# Altium PCB LUCID_LIGHT_PCB_Outer.PcbDoc (part 1 of 2)
Units mm, origin at the board's own origin, x right, y up, seen from the top; angles counter-clockwise.
Board outline 85 x 174.55 mm, 4 copper layers (Top Layer, GND, +48V_Fused, Bottom Layer), stack 1.58 mm thick; 120 components, 77 nets, 408 pads, 278 vias.
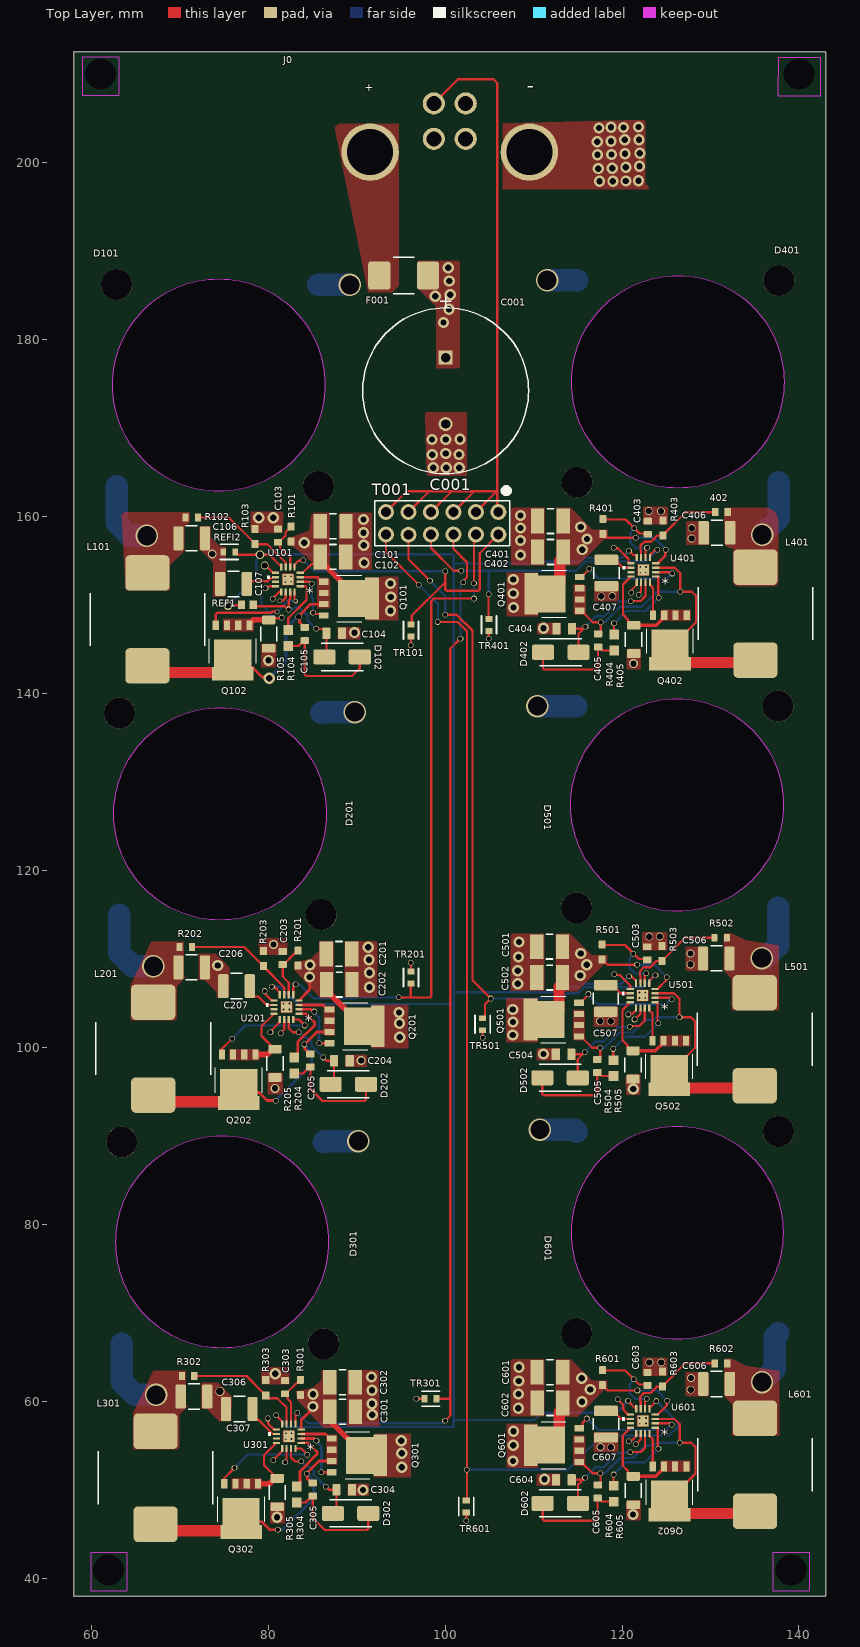
[diagram p0: Top Layer view]
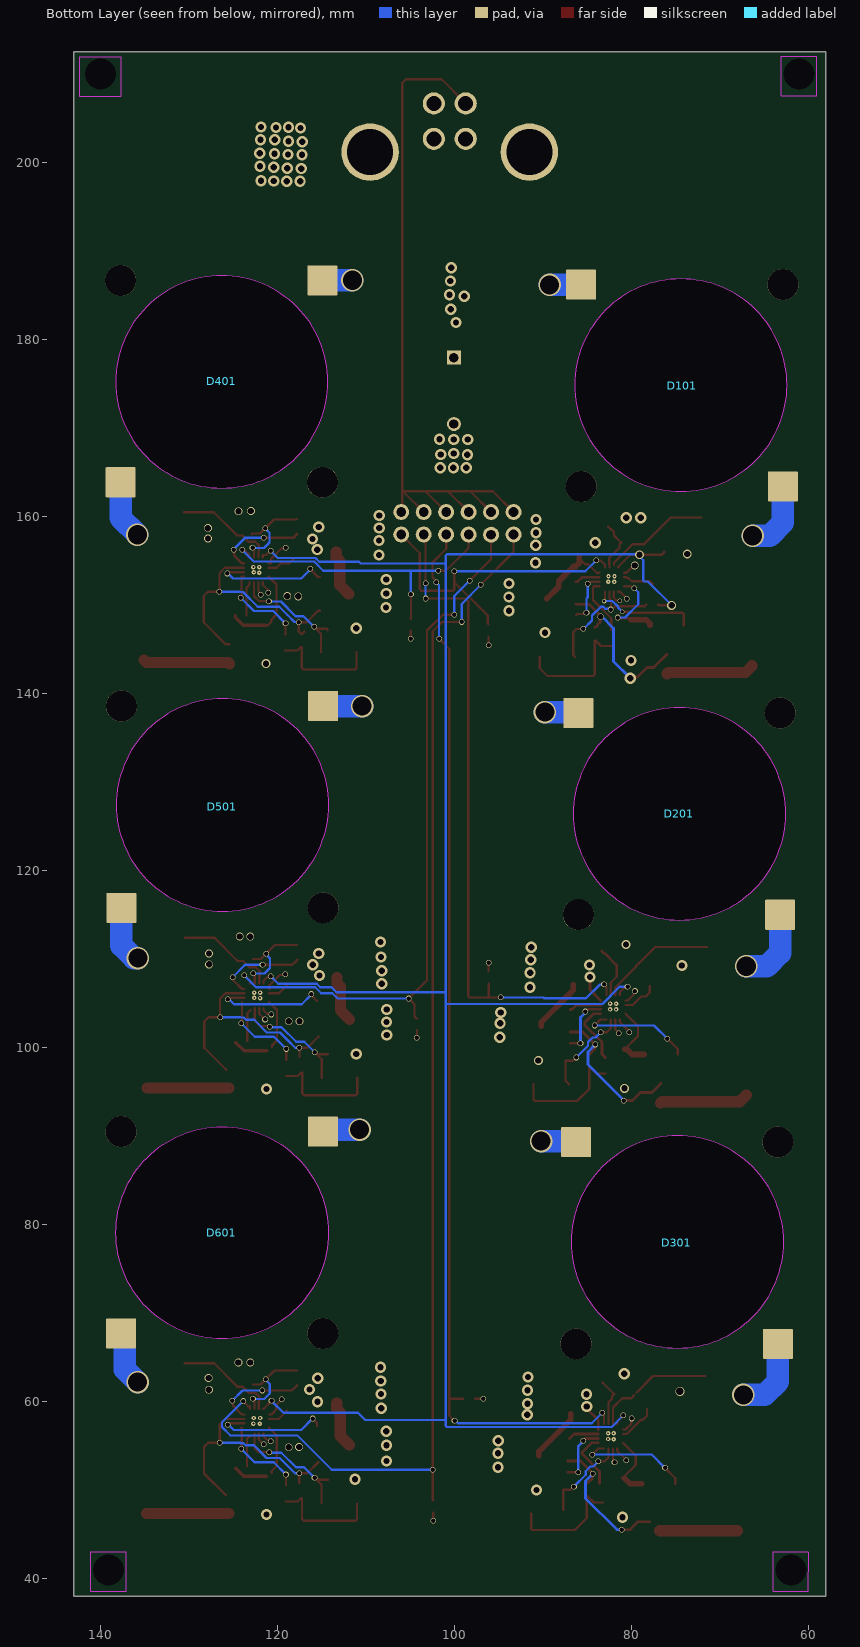
[diagram p1: Bottom Layer view, seen from below]
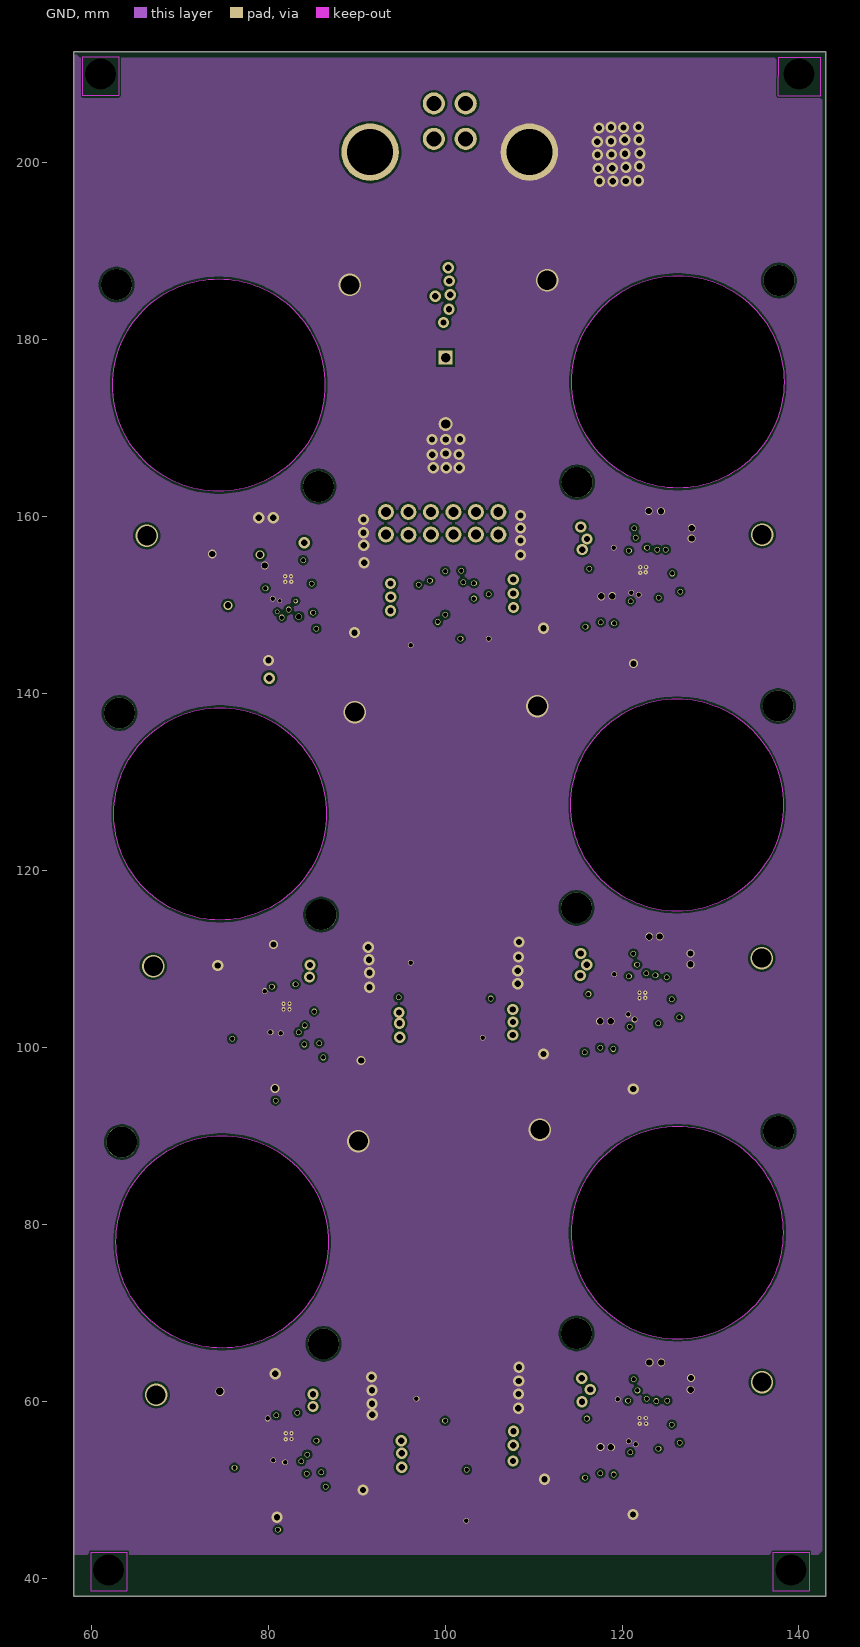
[diagram p2: GND]
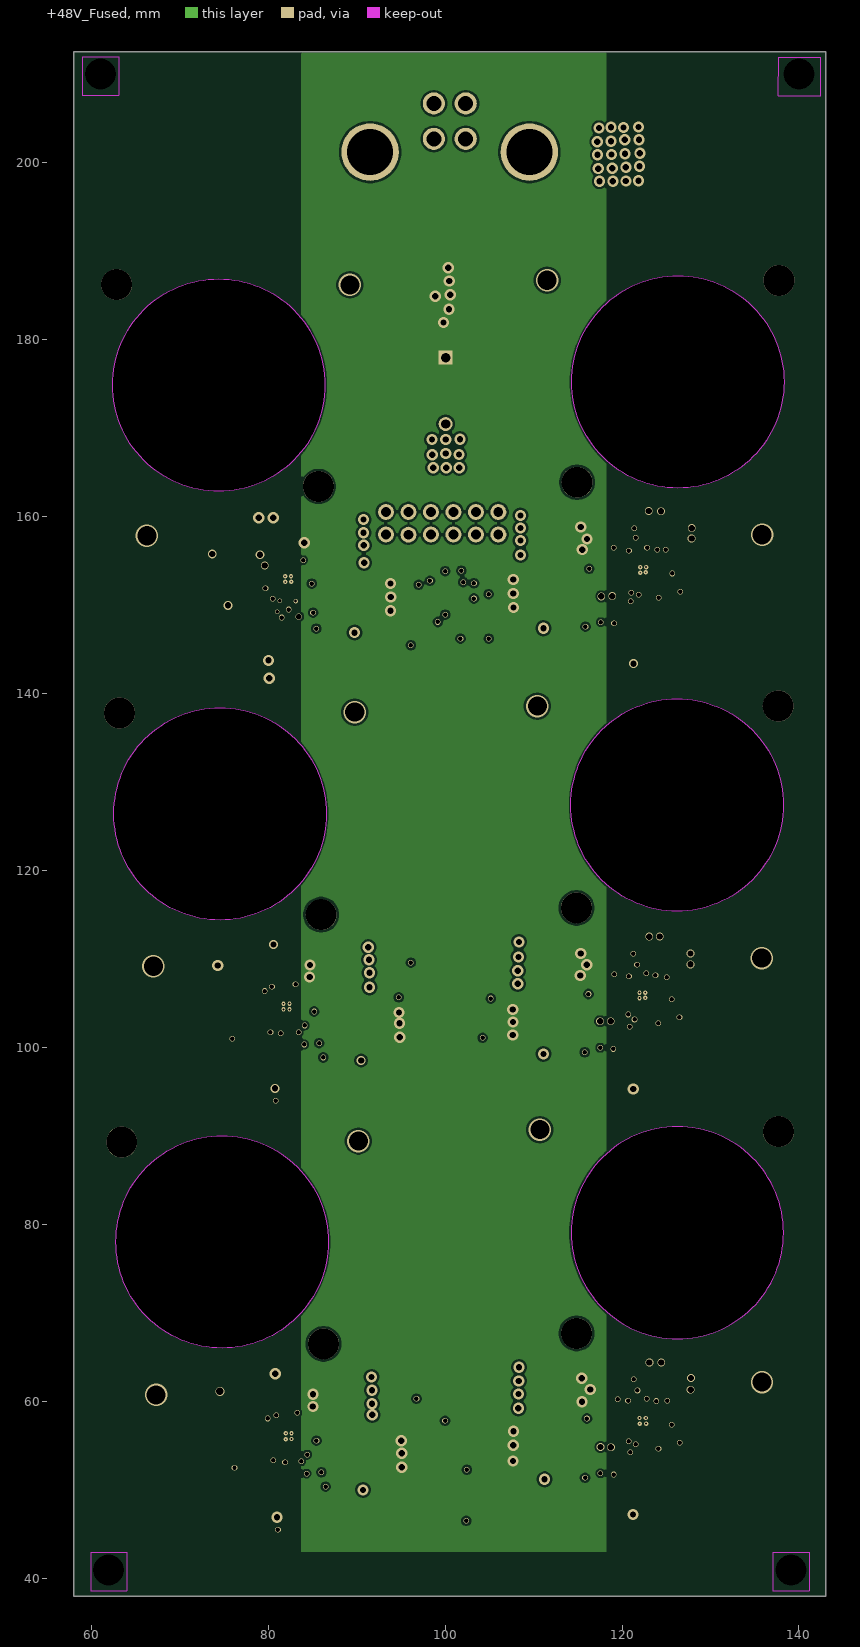
[diagram p3: +48V_Fused]

## Layer stack, top to bottom
Top Solder: solder mask 0.01, Solder Resist, Dk 3.5
Top Layer: signal copper 0.07
Dielectric 2: prepreg 0.2, PP-006, Dk 4.1
GND: signal copper 0.07
Dielectric 1: dielectric 0.9, FR-4, Dk 4.8
+48V_Fused: signal copper 0.07
Dielectric 3: prepreg 0.2, PP-006, Dk 4.1
Bottom Layer: signal copper 0.07
Bottom Solder: solder mask 0.01, Solder Resist, Dk 3.5

## Board outline
58.039,38 58.039,212.545 143.039,212.545 143.039,38
cut-out: 74.81,66.05 cw(c74.81,78.05) 62.81,78.05 cw(c74.81,78.05) 74.81,90.05 cw(c74.81,78.05) 86.81,78.05 cw(c74.81,78.05)
cut-out: 74.58,114.42 cw(c74.58,126.42) 62.58,126.42 cw(c74.58,126.42) 74.58,138.42 cw(c74.58,126.42) 86.58,126.42 cw(c74.58,126.42)
cut-out: 114.26,79.09 ccw(c126.26,79.09) 126.26,67.09 ccw(c126.26,79.09) 138.26,79.09 ccw(c126.26,79.09) 126.26,91.09 ccw(c126.26,79.09)
cut-out: 126.22,115.42 cw(c126.22,127.42) 114.22,127.42 cw(c126.22,127.42) 126.22,139.42 cw(c126.22,127.42) 138.22,127.42 cw(c126.22,127.42)
cut-out: 126.31,163.23 cw(c126.31,175.23) 114.31,175.23 cw(c126.31,175.23) 126.31,187.23 cw(c126.31,175.23) 138.31,175.23 cw(c126.31,175.23)
cut-out: 74.43,162.87 cw(c74.43,174.87) 62.43,174.87 cw(c74.43,174.87) 74.43,186.87 cw(c74.43,174.87) 86.43,174.87 cw(c74.43,174.87)

## Design rules (kind name [scope] priority, off if disabled: settings)
Clearance [All] p1: gap=0.254 ignorepadtopadclearanceinfootprint=FALSE except(0.152: Arc-Arc Arc-Track Arc-SMDPad Track-Track Track-SMDPad SMDPad-SMDPad; 0.203: Arc-Via Track-Via SMDPad-Via THPad-Via Via-Via)
HoleSize [All] p1: absolutevalues=TRUE maxlimit=5.334 minlimit=0.025 maxpercent=80.000 minpercent=20.000
MinimumSolderMaskSliver [All] p1: minsoldermaskwidth=0.15
PolygonConnect [All] p1: connectstyle=Direct reliefconductorwidth=0.254 reliefentries=4 polygonreliefangle="90 Angle" airgapwidth=0.254
PolygonConnect LX [InNet('LX-1')] p2: connectstyle=Direct reliefconductorwidth=0.254 reliefentries=4 polygonreliefangle="90 Angle" airgapwidth=0.254
PolygonConnect +48V [InNet('+48V')] p3: connectstyle=Direct reliefconductorwidth=0.254 reliefentries=4 polygonreliefangle="90 Angle" airgapwidth=0.254
PolygonConnect GND [InNet('GND')] p4: connectstyle=Direct reliefconductorwidth=0.254 reliefentries=4 polygonreliefangle="90 Angle" airgapwidth=0.254
RoutingVias [All] p1: holewidth=0.508 width=0.635 viastyle="Through Hole" minholewidth=0.508 minwidth=0.635 maxholewidth=5.334 maxwidth=5.334
SolderMaskExpansion MAX20078_Mask [IsPad AND InComponent('U101','U201','U301','U401','U501','U601')] p1: expansion=0.051 istentingtop=FALSE
SolderMaskExpansion Tent_All_Vias [IsVia] p2: expansion=0 istentingtop=TRUE
SolderMaskExpansion [All] p3: expansion=0 istentingtop=FALSE
SupplyNets "Schematic Supply Nets_1" [InNet('+48V')] p1: voltage=0.000
SupplyNets "Schematic Supply Nets" [InNet('GND')] p2: voltage=0.000
Width [All] p1: maxlimit=5.334 minlimit=0.254 preferedwidth=0.254 minimp=50.000000 maximp=50.000000 favimp=50.000000
28 further rules are at their usual default settings.

## Classes and differential pairs
component class Power_Connector: C001 F001 J0 T001
component class LED_BUK_6: C601 C602 C603 C604 C605 C606 C607 D601 D602 L601 Q601 Q602 R601 R602 R603 R604 R605 TR601 U601
component class LED_BUK_5: C501 C502 C503 C504 C505 C506 C507 D501 D502 L501 Q501 Q502 R501 R502 R503 R504 R505 TR501 U501
component class LED_BUK_4: 402 C401 C402 C403 C404 C405 C406 C407 D401 D402 L401 Q401 Q402 R401 R403 R404 R405 TR401 U401
component class LED_BUK_3: C301 C302 C303 C304 C305 C306 C307 D301 D302 L301 Q301 Q302 R301 R302 R303 R304 R305 TR301 U301
component class LED_BUK_2: C201 C202 C203 C204 C205 C206 C207 D201 D202 L201 Q201 Q202 R201 R202 R203 R204 R205 TR201 U201
component class LED_BUK_1: C101 C102 C103 C104 C105 C106 C107 D101 D102 L101 Q101 Q102 R101 R102 R103 R104 R105 REF1 REFI2 TR101 U101

## Components (designator, comment, footprint, x,y, rotation, side; value= is the part's Value field where it differs from the comment)
402 "RC0603FR-07324KL" RESC1608X55X25NL10T15 131.24,160.51 r180 top
C001 "MAL214658471E3" CAP_2135_18X20_VIS 100.07,177.97 r270 top
C101 "12101C225KAT2A" FP-1210-L_3_3_0_4-W_2_5_0-IPC_B 87.36,158.92 r0 top
C102 "12101C225KAT2A" FP-1210-L_3_3_0_4-W_2_5_0-IPC_B 87.34,155.45 r0 top
C103 "GRM1885C1H471JA01D" C_0603_1608Metric 81.129,157.849 r270 top
C104 "*AC0805KFX7R7BB225" C_0805_2012Metric 87.48,146.84 r180 top
C105 "CL10B224KA8NNNC" C_0603_1608Metric 84.15,146.75 r90 top
C106 "CL31B105KCHVPNE" C_1210_3225Metric 71.371,157.553 r0 top
C107 "CL31B105KCHVPNE" C_1210_3225Metric 76.1,152.4 r180 top
C201 "12101C225KAT2A" FP-1210-L_3_3_0_4-W_2_5_0-IPC_B 88.02,110.59 r0 top
C202 "12101C225KAT2A" FP-1210-L_3_3_0_4-W_2_5_0-IPC_B 88.05,107.12 r0 top
C203 "GRM1885C1H471JA01D" C_0603_1608Metric 81.66,110.12 r270 top
C204 "*AC0805KFX7R7BB225" C_0805_2012Metric 88.35,98.52 r0 top
C205 "CL10B224KA8NNNC" C_0603_1608Metric 84.79,98.55 r90 top
C206 "CL31B105KCHVPNE" C_1210_3225Metric 71.37,109.07 r0 top
C207 "CL31B105KCHVPNE" C_1210_3225Metric 76.44,106.96 r180 top
C301 "12101C225KAT2A" FP-1210-L_3_3_0_4-W_2_5_0-IPC_B 88.43,58.86 r0 top
C302 "12101C225KAT2A" FP-1210-L_3_3_0_4-W_2_5_0-IPC_B 88.41,62.19 r0 top
C303 "GRM1885C1H471JA01D" C_0603_1608Metric 81.923,61.63 r270 top
C304 "*AC0805KFX7R7BB225" C_0805_2012Metric 88.613,50.03 r0 top
C305 "CL10B224KA8NNNC" C_0603_1608Metric 85.053,50.06 r90 top
C306 "CL31B105KCHVPNE" C_1210_3225Metric 71.633,60.58 r0 top
C307 "CL31B105KCHVPNE" C_1210_3225Metric 76.76,59.16 r180 top
C401 "12101C225KAT2A" FP-1210-L_3_3_0_4-W_2_5_0-IPC_B 111.9,159.5 r180 top
C402 "12101C225KAT2A" FP-1210-L_3_3_0_4-W_2_5_0-IPC_B 111.91,156.01 r180 top
C403 "GRM1885C1H471JA01D" C_0603_1608Metric 122.93,158.75 r270 top
C404 "*AC0805KFX7R7BB225" C_0805_2012Metric 113.48,147.34 r180 top
C405 "CL10B224KA8NNNC" C_0603_1608Metric 117.3,146.02 r90 top
C406 "CL31B105KCHVPNE" C_1210_3225Metric 130.73,158.18 r180 top
C407 "CL31B105KCHVPNE" C_1210_3225Metric 118.24,153.64 r270 top
C501 "12101C225KAT2A" FP-1210-L_3_3_0_4-W_2_5_0-IPC_B 111.821,111.409 r180 top
C502 "12101C225KAT2A" FP-1210-L_3_3_0_4-W_2_5_0-IPC_B 111.831,107.919 r180 top
C503 "GRM1885C1H471JA01D" C_0603_1608Metric 122.851,110.659 r270 top
C504 "*AC0805KFX7R7BB225" C_0805_2012Metric 113.401,99.249 r180 top
C505 "CL10B224KA8NNNC" C_0603_1608Metric 117.221,97.929 r90 top
C506 "CL31B105KCHVPNE" C_1210_3225Metric 130.651,110.089 r180 top
C507 "CL31B105KCHVPNE" C_1210_3225Metric 118.161,105.549 r270 top
C601 "12101C225KAT2A" FP-1210-L_3_3_0_4-W_2_5_0-IPC_B 111.851,63.322 r180 top
C602 "12101C225KAT2A" FP-1210-L_3_3_0_4-W_2_5_0-IPC_B 111.861,59.832 r180 top
C603 "GRM1885C1H471JA01D" C_0603_1608Metric 122.881,62.572 r270 top
C604 "*AC0805KFX7R7BB225" C_0805_2012Metric 113.431,51.162 r180 top
C605 "CL10B224KA8NNNC" C_0603_1608Metric 117.251,49.842 r90 top
C606 "CL31B105KCHVPNE" C_1210_3225Metric 130.681,62.002 r180 top
C607 "CL31B105KCHVPNE" C_1210_3225Metric 118.191,57.462 r270 top
D101 "On back of PCB" BRIDGELUX_V22_CUSTOM 74.295,174.82 r90 top
D102 "B180-13-F" D_SMA_DO-214AC 88.37,144.15 r180 top
D201 "On back of PCB" BRIDGELUX_V22_CUSTOM 74.61,126.42 r90 top
D202 "B180-13-F" D_SMA_DO-214AC 89.07,95.86 r180 top
D301 "On back of PCB" BRIDGELUX_V22_CUSTOM 74.873,77.93 r90 top
D302 "B180-13-F" D_SMA_DO-214AC 89.333,47.37 r180 top
D401 "On back of PCB" BRIDGELUX_V22_CUSTOM 126.33,175.29 r180 top
D402 "B180-13-F" D_SMA_DO-214AC 113.08,144.68 r0 top
D501 "On back of PCB" BRIDGELUX_V22_CUSTOM 126.251,127.199 r180 top
D502 "B180-13-F" D_SMA_DO-214AC 113.001,96.589 r0 top
D601 "On back of PCB" BRIDGELUX_V22_CUSTOM 126.281,79.112 r180 top
D602 "B180-13-F" D_SMA_DO-214AC 113.031,48.502 r0 top
F001 "JFC2410-2200FS" F_2410_JDTfuse 95.325,187.25 r0 top
J0 "AS150UPB_2+4" AS150UPB_2+4 100.539,201.197 r0 top locked
L101 "YSPI1365-470M" L_YSPI1365_470M 66.379,148.394 r90 top
L201 "YSPI1365-470M" L_YSPI1365_470M 67.03,99.89 r90 top
L301 "YSPI1365-470M" L_YSPI1365_470M 67.293,51.4 r90 top
L401 "YSPI1365-470M" L_YSPI1365_470M 135.08,149.04 r90 top
L501 "YSPI1365-470M" L_YSPI1365_470M 135.001,100.949 r90 top
L601 "YSPI1365-470M" L_YSPI1365_470M 135.031,52.862 r90 top
Q101 "custom mosfet" LFPAK56_SOT669_BUK9Y107 86.29,150.75 r270 top
Q102 "custom mosfet" LFPAK56_SOT669_BUK9Y107 76.007,147.726 r180 top
Q201 "custom mosfet" LFPAK56_SOT669_BUK9Y107 86.94,102.41 r270 top
Q202 "custom mosfet" LFPAK56_SOT669_BUK9Y107 76.69,99.22 r180 top
Q301 "custom mosfet" LFPAK56_SOT669_BUK9Y107 87.203,53.92 r270 top
Q302 "custom mosfet" LFPAK56_SOT669_BUK9Y107 76.953,50.73 r180 top
Q401 "custom mosfet" LFPAK56_SOT669_BUK9Y107 115.22,151.27 r90 top
Q402 "custom mosfet" LFPAK56_SOT669_BUK9Y107 125.42,148.86 r180 top
Q501 "custom mosfet" LFPAK56_SOT669_BUK9Y107 115.141,103.179 r90 top
Q502 "custom mosfet" LFPAK56_SOT669_BUK9Y107 125.341,100.769 r180 top
Q601 "custom mosfet" LFPAK56_SOT669_BUK9Y107 115.171,55.092 r90 top
Q602 "custom mosfet" LFPAK56_SOT669_BUK9Y107 125.371,52.682 r180 top
R101 "*RC0603FR-0747K5L" R_0603_1608Metric 82.618,158.047 r90 top
R102 "RC0603FR-07324KL" RESC1608X55X25NL10T15 71.385,159.893 r0 top
R103 "RC0603FR-0724K9L" FP-RC_L0603-MFG 78.546,157.743 r90 top value=24.9kΩ
R104 "4R7 1% 0603(1608)" RESC0603(1608)_M 82.289,146.295 r90 top value="4.70 Ohm"
R105 "FRM121WFR100TM" R_1206_3216Metric 80.077,146.736 r90 top
R201 "*RC0603FR-0747K5L" R_0603_1608Metric 83.39,110.11 r90 top
R202 "RC0603FR-07324KL" RESC1608X55X25NL10T15 70.71,111.38 r0 top
R203 "RC0603FR-0724K9L" FP-RC_L0603-MFG 79.48,110.06 r90 top value=24.9kΩ
R204 "4R7 1% 0603(1608)" RESC0603(1608)_M 82.97,97.99 r90 top value="4.70 Ohm"
R205 "FRM121WFR100TM" R_1206_3216Metric 80.78,98.22 r90 top
R301 "*RC0603FR-0747K5L" R_0603_1608Metric 83.653,61.62 r90 top
R302 "RC0603FR-07324KL" RESC1608X55X25NL10T15 70.973,62.89 r0 top
R303 "RC0603FR-0724K9L" FP-RC_L0603-MFG 79.743,61.57 r90 top value=24.9kΩ
R304 "4R7 1% 0603(1608)" RESC0603(1608)_M 83.233,49.5 r90 top value="4.70 Ohm"
R305 "FRM121WFR100TM" R_1206_3216Metric 81.043,49.73 r90 top
R401 "*RC0603FR-0747K5L" R_0603_1608Metric 117.84,158.89 r90 top
R403 "RC0603FR-0724K9L" FP-RC_L0603-MFG 124.62,158.72 r90 top value=24.9kΩ
R404 "4R7 1% 0603(1608)" RESC0603(1608)_M 119.12,145.78 r90 top value="4.70 Ohm"
R405 "FRM121WFR100TM" R_1206_3216Metric 121.32,146.13 r90 top
R501 "*RC0603FR-0747K5L" R_0603_1608Metric 117.761,110.799 r90 top
R502 "RC0603FR-07324KL" RESC1608X55X25NL10T15 131.161,112.419 r180 top
R503 "RC0603FR-0724K9L" FP-RC_L0603-MFG 124.541,110.629 r90 top value=24.9kΩ
R504 "4R7 1% 0603(1608)" RESC0603(1608)_M 119.041,97.689 r90 top value="4.70 Ohm"
R505 "FRM121WFR100TM" R_1206_3216Metric 121.241,98.039 r90 top
R601 "*RC0603FR-0747K5L" R_0603_1608Metric 117.791,62.712 r90 top
R602 "RC0603FR-07324KL" RESC1608X55X25NL10T15 131.191,64.332 r180 top
R603 "RC0603FR-0724K9L" FP-RC_L0603-MFG 124.571,62.542 r90 top value=24.9kΩ
R604 "4R7 1% 0603(1608)" RESC0603(1608)_M 119.071,49.602 r90 top value="4.70 Ohm"
R605 "FRM121WFR100TM" R_1206_3216Metric 121.271,49.952 r90 top
REF1 "ERJ-3EKF3162V" RESC1608X55X30NL15T15 77.66,150.04 r180 top
REFI2 "RC0603FR-0710KL" FP-RC0603-0_55-IPC_C 75.625,156.025 r180 top
T001 "DS1021-2x6SF11-B" LUCID_Connectors 106.03,160.525 r270 top
TR101 "RC0603FR-0710KL" FP-RC0603-0_55-IPC_C 96.15,147.15 r90 top
TR201 "RC0603FR-0710KL" FP-RC0603-0_55-IPC_C 96.15,107.925 r270 top
TR301 "RC0603FR-0710KL" FP-RC0603-0_55-IPC_C 98.375,60.325 r0 top
TR401 "RC0603FR-0710KL" FP-RC0603-0_55-IPC_C 104.975,147.775 r90 top
TR501 "RC0603FR-0710KL" FP-RC0603-0_55-IPC_C 104.25,102.65 r90 top
TR601 "RC0603FR-0710KL" FP-RC0603-0_55-IPC_C 102.4,48.15 r90 top
U101 "MAX20078ATE/V+T" 21-0136V_T1633+4C_MXM#1 82.25,152.9 r180 top
U201 "MAX20078ATE/V+T" 21-0136V_T1633+4C_MXM#2 82.09,104.58 r180 top
U301 "MAX20078ATE/V+T" 21-0136V_T1633+4C_MXM#2 82.353,56.09 r180 top
U401 "MAX20078ATE/V+T" 21-0136V_T1633+4C_MXM#2 122.41,153.98 r180 top
U501 "MAX20078ATE/V+T" 21-0136V_T1633+4C_MXM#2 122.331,105.889 r180 top
U601 "MAX20078ATE/V+T" 21-0136V_T1633+4C_MXM#2 122.361,57.802 r180 top

## Footprints (in the part's own frame and the unit in brackets; to place one, negate y for a bottom-side part, rotate by r counter-clockwise, add the part's x,y. Pads: shape width x height; smd on the part's side, far side on the other; paste and mask are expansions set on the pad)
21-0136V_T1633+4C_MXM#1 [mil]
  rect 32x10 smd paste+0 mask+0: 1(-55,29.53) 2(-55,9.84) 3(-55,-9.84) 4(-55,-29.53) 9(55,-29.53) 10(55,-9.84) 11(55,9.84) 12(55,29.53)
  rect 10x32 smd paste+0 mask+0: 5(-29.53,-55) 6(-9.84,-55) 7(9.84,-55) 8(29.53,-55) 13(29.53,55) 14(9.84,55) 15(-9.84,55) 16(-29.53,55)
  rect 50x50 smd paste+0 mask+0: 17(0,0)
  silkscreen extent 81,-17 91,-2, body extent -59,-59 59,59, height 32
21-0136V_T1633+4C_MXM#2 [mil]
  rect 32x10 smd paste+0 mask+0: 1(-55,29.53) 2(-55,9.84) 3(-55,-9.84) 4(-55,-29.53) 9(55,-29.53) 10(55,-9.84) 11(55,9.84) 12(55,29.53)
  rect 10x32 smd paste+0 mask+0: 5(-29.53,-55) 6(-9.84,-55) 7(9.84,-55) 8(29.53,-55) 13(29.53,55) 14(9.84,55) 15(-9.84,55) 16(-29.53,55)
  rect 49x49 smd paste+0 mask+0: 17(0,0)
  silkscreen extent 81,-17 91,-2, body extent -59,-59 59,59, height 32
AS150UPB_2+4 [mm]
  round 6.5 hole 5.2: 1(-9,0) 2(9,0)
  round 2.5 hole 1.7: 3(-1.8,5.5) 4(1.8,5.5) 5(-1.8,1.5) 6(1.8,1.5)
BRIDGELUX_V22_CUSTOM [mm]
  rrect7% 3.4x3.4 smd far side paste-2539.97: 1(11.4,-11.4) 2(-11.4,11.4)
  round 3.5 hole 3.5 unplated: Screw1(11.4,11.4) Screw2(-11.4,-11.4)
C_0603_1608Metric [mm] "Chip Ceramic Capacitor, 2-Leads, Body 1.60x0.80mm, IPC Medium Density, Samsung 0603 Reference"
  rrect25% 0.78x0.95 smd: 1(-0.74,0) 2(0.74,0)
  body extent -0.88,-0.48 0.87,0.48, height 0.95
C_0805_2012Metric [mm] "Chip Ceramic Capacitor, 2-Leads, Body 2.00x1.25mm, IPC Medium Density, Samsung 0805 Reference"
  rrect25% 0.93x1.3 smd: 1(-0.885,0) 2(0.885,0)
  body extent -1.05,-0.67 1.05,0.68, height 1.35
C_1210_3225Metric [mm] "Chip Ceramic Capacitor, 2-Leads, Body 3.20x2.50mm, IPC Medium Density, KEMET 1210 Reference"
  rrect25% 1.15x2.7 smd: 1(-1.5,0) 2(1.5,0)
  silkscreen extent -0.65,-1.43 0.65,1.43, body extent -1.75,-1.35 1.75,1.35, height 2.2
CAP_2135_18X20_VIS [mil]
  rect 62x62 hole 42 paste-99999 mask+0: 1(0,0)
  round 62 hole 42 paste-99999 mask+0: 2(295.28,0)
  silkscreen extent -276,-369 517,369, body extent -216,-364 513,364, height 867
D_SMA_DO-214AC [mm] "Molded Diode, 2-Leads, Body 4.30x2.61mm, IPC Medium Density"
  rrect25% 2.5x1.7 smd: 1(-2,0) 2(2,0)
  silkscreen extent -2.38,-1.54 2.37,1.54, body extent -2.3,-1.46 2.3,1.46, height 2.4
F_2410_JDTfuse [mm] "20A Fuse 72V"
  rrect25% 2.5x3.2 smd: 1(-2.75,0) 2(2.75,0)
  silkscreen extent -1.2,-2.05 1.2,2.05, body extent -3.15,-1.47 3.15,1.47, height 2.94
FP-1210-L_3_3_0_4-W_2_5_0-IPC_B [mm]
  rect 1.503x2.804 smd paste+0 mask+0: 1(-1.45,0) 2(1.45,0)
  silkscreen extent -0.34,-1.4 0.34,1.4, body extent -2.45,-1.65 2.45,1.65, height 0.25
FP-RC0603-0_55-IPC_C [mm]
  rect 0.659x0.812 smd paste+0 mask+0: 1(-0.677,0) 2(0.677,0)
  silkscreen extent -1.01,-0.85 1.01,0.85, body extent -1.11,-0.55 1.11,0.55, height 0.25
FP-RC_L0603-MFG [mm]
  rect 0.9x0.8 smd paste+0 mask+0: 1(-0.85,0) 2(0.85,0)
  body extent -1.4,-0.55 1.4,0.55, height 0.25
L_YSPI1365_470M [mm] "YJYCOIN YSPI1365-470M, 47uH, SMD Power Inductor, JLCPCB C497913"
  rrect25% 4x5 smd: 1(-5.25,0) 2(5.25,0)
  silkscreen extent -2.98,-6.48 2.98,6.48, body extent -6.9,-6.4 6.9,6.4, height 6.5
LFPAK56_SOT669_BUK9Y107 [mm]
  rect 0.7x1.1 smd paste-0.05 mask+0.075: 1(-1.905,0) 2(-0.635,0) 3(0.635,0) 4(1.905,0)
  rect 4.2x3.3 smd paste-2.2 mask+0.075: 5(0,3.27)
  rect 4.7x1.55 smd paste-2.2 mask+0.075: 6(0,5.47)
  silkscreen extent -2.65,1.5 2.65,4.31
LUCID_Connectors [mm]
  round 1.8 hole 1.1: 1(0,0) 2(2.54,0) 3(0,-2.54) 4(2.54,-2.54) 5(0,-5.08) 6(2.54,-5.08) 7(0,-7.62) 8(2.54,-7.62) 9(0,-10.16) 10(2.56,-10.16) 11(0,-12.7) 12(2.54,-12.7)
  silkscreen extent -2.54,-13.97 3.81,1.27
R_0603_1608Metric [mm] "Chip Resistor, 2-Leads, Body 1.60x0.80mm, IPC Medium Density"
  rrect25% 0.9x0.8 smd: 1(-0.85,0) 2(0.85,0)
  body extent -0.85,-0.45 0.85,0.45, height 0.55
R_1206_3216Metric [mm] "Chip Resistor, 2-Leads, Body 3.20x1.60mm, IPC Medium Density, JLCPCB-compatible land pattern"
  rrect25% 1x1.5 smd: 1(-1.6,0) 2(1.6,0)
  silkscreen extent -0.82,-0.92 0.82,0.93, body extent -1.6,-0.85 1.6,0.85, height 0.65
RESC0603(1608)_M [mm] "Chip Resistor, Body 1.6x0.8mm, IPC Low Density"
  rect 1.1x1.1 smd: 1(-0.9,0) 2(0.9,0)
  body extent -0.85,-0.47 0.85,0.47, height 0.6
RESC1608X55X25NL10T15 [mm] "Chip Resistor, 2-Leads, Body 1.60x0.80mm, IPC Medium Density"
  rect 0.7x0.9 smd: 1(-0.7,0) 2(0.7,0)
  body extent -0.85,-0.45 0.85,0.45, height 0.55
RESC1608X55X30NL15T15 [mm] "Chip Resistor, 2-Leads, Body 1.60x0.80mm, IPC Medium Density"
  rect 0.8x0.95 smd: 1(-0.675,0) 2(0.675,0)
  body extent -0.87,-0.48 0.87,0.48, height 0.55

## Part data
402 R102 R202 R302 R502 R602: library part CMP-2000-04009-1, LCSC Part #=C273758, Manufacturer=Yageo, Part Number=RC0603FR-07324KL
C001: "Rad 63V 470uF 18x20 125Â°C (CA)", JLCPCB Part #=C85979, Manufacturer_Name=Vishay, Copyright="Copyright (C) 2026 Ultra Librarian. All rights reserved.", Manufacturer_Part_Number=MAL214658471E3
C101 C102 C201 C202 C301 C302 C401 C402 C501 C502 C601 C602: library part CMP-1038-02104-3, "General Purpose Ceramic Capacitor, 1210, 2.2uF, 10%, X7R, 15%, 100V", Capacitance=2.2uF, Case Code (Imperial)=1210, Case Code (Metric)=3225, Dielectric=X7R, LCSC Part #=C2168116, Max Operating Temperature=125°C, Min Operating Temperature=-55°C, Package Quantity=1, Tolerance=10%, Voltage=100V, Case/Package=1210, Construction=Flat, Contact Plating=Tin, Depth=2.5mm, Dissipation Factor=2.5%, Height=2.79mm, Lead Free="Lead Free", Length=3.2mm, Mount="Surface Mount", Number of Pins=2, Packaging="Tape and Reel", Radiation Hardening=No, REACH SVHC="No SVHC", RoHS Compliant=Yes, Series=-, Termination=SMD/SMT, Thickness=0.11inch, Voltage Rating=100V, Voltage Rating (DC)=100V, Width=2.5mm
C103 C203 C303 C403 C503 C603: "470 pF, 50 V, C0G, 0603", LCSC Part #=C85979, Supplier 1=Avnet, Supplier Part Number 1=GRM1885C1H471JA01D
C104 C204 C304 C404 C504 C604: library part AC0805KFX7R7BB225, "2.2 µF, 16 V, X7R, 0805", LCSC Part #=C20143097, Supplier 1=Avnet, Supplier Part Number 1=AC0805KFX7R7BB225
C105 C205 C305 C405 C505 C605: "0.22 µF, 25 V, X7R, 0603", LCSC Part #=C21120, Supplier 1="Future Electronics", Supplier Part Number 1=CL10B224KA8NNNC
C106 C107 C206 C207 C306 C307 C406 C407 C506 C507 C606 C607: "1 µF, 100 V DC, 1206 (3216 metric)", LCSC Part #=C307368, Supplier Part Number 1=187-CL31B105KCHVPNE, Supplier 1=Mouser
D101 D201 D301 D401 D501 D601: library part Bridgelux_V22_Custom
D102 D202 D302 D402 D502 D602: "Schottky diode, SMA", LCSC Part #=C155354, Supplier 1=Newark, Supplier Part Number 1=B180-13-F
F001: "20A Fuse. 72V", LSCS Part #=JDTfuse
L101 L201 L301 L401 L501 L601: library part CompoYSPI1365-470Mnent_1, "47 µH inductor", LCSC Part #=C497913
Q101 Q102 Q201 Q202 Q301 Q302 Q401 Q402 Q501 Q502 Q601 Q602: library part BUK9Y107-80EX, "80 V N-channel MOSFET", LSCS Part #=C503620, Supplier 1="Arrow Electronics", Supplier Part Number 1=BUK9Y107-80EX
R101 R201 R301 R401 R501 R601: library part RC0603FR-0747K5L, "47.5 kΩ", LCSC Part #=C137715, Supplier 1=Newark, Supplier Part Number 1=RC0603FR-0747K5L
R103 R203 R303 R403 R503 R603: library part CMP-03412-013083-1, "RES SMD 24.9K OHM 1% 1/10W 0603", Approved Alternate Part Number=541-1.00HHCT-ND, LCSC Part #=C137761, Manufacturer=Yageo, Package=RC_L0603, Power=100mW, Power Rating=0.1W, Resistance=24.9kΩ, Temperature="-55°C to +155°C", Temperature Coefficient=100ppm/°C, Temperature Range High=+155°C, Temperature Range Low=-55°C, Tolerance=1%, Voltage=75V, Automotive=No, Category=Res, ComponentLink2Description=Datasheet, ComponentLink2URL=https://www.yageo.com/upload/media/product/productsearch/datasheet/rchip/PYu-RC_Group_51_RoHS_L_10.pdf, Composition="Thick Film", Device Class L1="Passive Components", Device Class L2=Resistors, Device Class L3="Chip SMD Resistors", Digikey Description="RES SMD 24.9K OHM 1% 1/10W 0603", Footprint Url=https://www.yageo.com/upload/website/yageo_PYu-R_Mount_10_19050818_343.pdf, Height=0.55mm, Ipc Land Pattern Name=RESC16080X45, Lead Free=Yes, Manufacturer Part Number=RC0603FR-0724K9L, Mouser Description="Res Thick Film 1.6 x 0.8 mm 24.9K Ohm 1% 0.1W(1/10W) 100ppm/ C Molded SMD Paper T/R", Octopart=https://octopart.com/rc0603fr-0724k9l-yageo-1189838, RoHS=TRUE, Series=RC_L, Voltage Rating=75V
R104 R204 R304 R404: library part CMP-1012-00247-1, "4R7 0.1W 1% 0603 (1608 Metric)  SMD", Case-EIA=0603, Case-Metric=1608, LCSC Part #=C137705, Power="0.1 W", Tolerance="1 %", Technology=SMT
R105 R205 R305 R405 R505 R605: "0.1 Ω, 1 W, 1206", LCSC Part #=C7467250
R504 R604: library part CMP-1012-00247-1, "4R7 0.1W 1% 0603 (1608 Metric)  SMD", Case-EIA=0603, Case-Metric=1608, Power="0.1 W", Tolerance="1 %", LSCS Part #=C137705, Technology=SMT
REF1: library part CMP-2000-00428-1, LCSC Part #=C403154, Manufacturer=Panasonic, Part Number=ERJ-3EKF3162V
REFI2 TR101 TR201 TR301 TR401 TR501 TR601: library part CMP-2100-03664-2, "RES 10K OHM 1% 1/10W 0603", Case Code (Imperial)=0603, Case Code (Metric)=1608, LCSC Part #=C98220, Max Operating Temperature=155°C, Max Power Dissipation=100mW, Min Operating Temperature=-55°C, Resistance=10kR, Resistance Tolerance=1%, Resistor Type="Thick Film", Temperature Coefficient=100ppm/°C, Voltage Rating=75V, Voltage Rating (DC)=50V, Case/Package=0603, Construction=Rectangular, Depth=0.8mm, Features="Moisture Resistant", Height=0.45mm, Lead Free="Lead Free", Lead Pitch=0.3mm, Length=1.6mm, Military Standard=Not, Number of Pins=2, Number of Terminations=2, Packaging="Tape and Reel", Power Rating=100mW, RoHS Compliant=Yes, Series=RC, Size Code=0603, Termination=SMD/SMT, Tolerance=1%, Weight=7.1E-05oz, Width=0.8mm
T001: "For testing. Dims PWM", LCSC Part #=C7430402
U101 U201 U301 U401 U501 U601: library part MAX20078ATEV+T, "Synchronous Buck, High-Brightness LED Controller", Manufacturer_Name="Analog Devices Inc", Supplier Part Number 1=700-MAX20078ATE/V+T, Copyright="Copyright (C) 2026 Ultra Librarian. All rights reserved.", LSCS Part #=C2679249, Manufacturer_Part_Number=MAX20078ATE/V+T, RefDes=RefDes, Supplier 1=Mouser, Type=Type

## Free pads (board coordinates)
  round 1.524 hole 3.5 unplated: Screw(61.08,210) Screw(62,41) Screw(139.09,41) Screw(140,210)

## Via types
v1: diameter 0.635, hole 0.508, Top Layer to Bottom Layer, tented both sides, 106 vias
v2: diameter 1.27, hole 0.711, Top Layer to Bottom Layer, tented both sides, 105 vias
v3: diameter 0.5, hole 0.2, Top Layer to Bottom Layer, tented both sides, 24 vias
v4: diameter 0.889, hole 0.711, Top Layer to Bottom Layer, tented both sides, 19 vias
v5: diameter 2.54, hole 2.159, Top Layer to Bottom Layer, tented both sides, 12 vias
v6: diameter 1.016, hole 0.711, Top Layer to Bottom Layer, tented both sides, 6 vias
v7: diameter 0.508, hole 0.381, Top Layer to Bottom Layer, tented both sides, 3 vias
v8: diameter 1, hole 0.711, Top Layer to Bottom Layer, tented both sides, 1 vias
v9: diameter 1.016, hole 0.889, Top Layer to Bottom Layer, tented both sides, 1 vias
v10: diameter 0.762, hole 0.635, Top Layer to Bottom Layer, tented both sides, 1 vias

## Nets (pads, with @x,y where several pads share a name; then routed paths per layer and width w, separated by ;. In a path a pad name is that pad's centre, name@x,y a point inside that pad or via, vN(x,y) a via of type N, cw(c..) or ccw(c..) an arc to the next point about the centre after c; other vN are vias at no path point)
+48V: C001.1 C101.1 C102.1 C201.1 C202.1 C301.1 C302.1 C401.1 C402.1 C501.1 C502.1 C601.1 C602.1 F001.2 Q101.5 Q101.6 Q201.5 Q201.6 Q301.5 Q301.6 Q401.5 Q401.6 Q501.5 Q501.6 Q601.5 Q601.6 R101.1 R201.1 R301.1 R401.1 R501.1 R601.1 U101.4 U201.4 U301.4 U401.4 U501.4 U601.4 | length 75
  Top Layer w0.254: U101.4@83.647,153.65 83.926,153.65 84.906,154.63 85.265,154.63 85.89,155.254 C102.1@85.89,155.45 ; R501.1@117.761,109.949 117.761,109.899 118.034,109.626 118.084,109.626 118.35,109.36 v1(121.7,109.36) ; R601.1@117.791,61.862 117.791,61.812 118.064,61.539 118.114,61.539 118.393,61.26 v1(121.75,61.26) ; U501.4@123.728,106.639 124.007,106.639 124.997,107.629 124.997,107.897 v1(125.07,107.97) ; U601.4@123.758,58.552 124.037,58.552 125.047,59.562 125.047,60.037 v1(125.12,60.11)
  Top Layer w0.305: U201.4@83.487,105.33 84.7,106.543 v2(84.7,107.99) ; U301.4@83.75,56.84 83.75,57.9 85.07,59.22 v2(85.07,59.44) ; R401.1@117.84,158.04 117.84,157.99 118.22,157.61 v1(121.57,157.61) ; U401.4@123.807,154.73 124.036,154.73 124.877,155.571 124.877,156.207 v1(124.94,156.27)
  Top Layer w0.635: v2@84.578,107.868 v2(84.7,107.99) ; C102.1@85.89,155.45 85.89,154.799 86.324,154.365 86.56,154.365 88.227,152.698 88.227,152.082 Q101.5@89.56,150.75 ; C202.1@86.6,107.12 86.6,106.469 C202.1@87.034,106.035 ; C301.1@86.863,58.63 86.863,57.979 87.297,57.545 90.473,54.37 Q301.5@90.473,53.92 ; C202.1@87.035,106.035 90.21,102.86 Q201.5@90.21,102.41
  Top Layer w1.27: Q501.5@111.871,103.179 112.886,104.194 112.886,106.873 113.281,107.268 C502.1@113.281,107.919 ; Q601.5@111.901,55.092 112.916,56.107 112.916,58.786 113.311,59.181 C602.1@113.311,59.832 ; Q401.5@111.95,151.27 112.965,152.285 112.965,154.964 113.36,155.359 C402.1@113.36,156.01
  Bottom Layer w0.254: v1(121.7,109.36) 123.68,109.36 v1(125.07,107.97) ; v1(121.75,61.26) 123.97,61.26 v1(125.12,60.11)
  Bottom Layer w0.305: v1(121.57,157.61) 123.689,157.61 124.94,156.359 v1(124.94,156.27)
  other v2: 95.1,52.59 107.68,53.3 95.1,54.17 107.7,55.06 95.05,55.58 107.73,56.66 115.48,59.98 85.08,60.84 116.4,61.38 115.46,62.65 94.89,101.18 107.66,101.44 94.85,102.76 107.68,102.91 94.79,103.975 107.66,104.32 115.27,108.149 84.74,109.35 116.03,109.36 115.34,110.65 93.85,149.36 107.75,149.73 93.86,150.93 107.72,151.33 93.85,152.44 107.71,152.9 115.51,156.279 84.1,157.05 116.05,157.48 115.34,158.84 99.83,181.94 100.44,183.45 98.9,184.9 100.58,185.08 100.47,186.64 100.37,188.13
BST-1: R104.2 U101.1 | length 6.4
  Top Layer w0.254: R104.2@82.289,147.195 82.289,148.529 84.35,150.59 84.35,152.001 84.201,152.15 U101.1@83.647,152.15
BST-2: R204.2 U201.1 | length 7.1
  Top Layer w0.305: R204.2@82.97,98.89 83.348,99.268 83.348,100.618 85.294,102.564 85.294,102.816 84.28,103.83 U201.1@83.487,103.83
BST-3: R304.2 U301.1 | length 6.6
  Top Layer w0.305: R304.2@83.611,50.778 83.611,52.128 85.557,54.074 85.557,54.326 84.543,55.34 U301.1@83.75,55.34
BST-4: R404.2 U401.1 | length 10.2
  Top Layer w0.254: v1(119.1,147.94) 119.1,146.7 R404.2@119.12,146.68 ; U401.1@123.807,153.23 124.086,153.23 124.086,151.027 124.17,150.943 v1(124.17,150.84)
  Bottom Layer w0.254: v1(119.1,147.94) 120.49,149.33 122.66,149.33 v1(124.17,150.84)
BST-5: R504.2 U501.1 | length 9.7
  Top Layer w0.254: R504.2@119.021,98.609 v1(119.021,99.849) ; v1@124.007,102.936 U501.1@124.007,105.139
  Bottom Layer w0.254: v1(119.021,99.849) 120.411,101.239 122.581,101.239 v1(124.091,102.749)
BST-6: R604.2 U601.1 | length 9.7
  Top Layer w0.254: R604.2@119.051,50.522 v1(119.051,51.762) ; v1@124.037,54.849 U601.1@124.037,57.052
  Bottom Layer w0.254: v1(119.051,51.762) 120.441,53.152 122.611,53.152 v1(124.121,54.662)
CSP-1: Q102.1 Q102.2 Q102.3 R105.2 U101.12 | length 10.3
  Top Layer w0.254: v1(79.71,151.91) 79.813,151.91 80.053,152.15 U101.12@80.853,152.15 ; R105.2@80.077,148.336 80.268,148.527 81.497,148.527 v1(81.57,148.6)
  Top Layer w0.635: Q102.1@77.912,147.726 77.912,147.926 78.322,148.336 R105.2@80.077,148.336
  Bottom Layer w0.254: v1(79.71,151.91) 79.25,151.45 79.25,150.09 80.74,148.6 v1(81.57,148.6)
CSP-2: Q202.1 Q202.2 Q202.3 R205.2 U201.12 | length 7.7
  Top Layer w0.254: U201.12@80.693,103.83 79.27,102.407 79.27,101.33 R205.2@80.78,99.82
  Top Layer w0.635: Q202.1@78.595,99.22 79.93,99.22 80.53,99.82 R205.2@80.78,99.82
CSP-3: Q302.1 Q302.2 Q302.3 R305.2 U301.12 | length 7.4
  Top Layer w0.254: U301.12@80.956,55.34 79.533,53.917 79.533,52.84 R305.2@81.043,51.33
  Top Layer w0.635: Q302.1@78.858,50.73 80.193,50.73 R305.2@80.793,51.33
CSP-4: Q402.1 Q402.2 Q402.3 R405.2 U401.12 | length 10.6
  Top Layer w0.254: U401.12@121.013,153.23 120.11,152.327 120.11,148.94 120.716,148.334 120.716,148.103 121.089,147.73 R405.2@121.32,147.73 ; Q402.3@124.785,148.66 Q402.3@124.785,148.86
  Top Layer w0.381: R405.2@121.32,147.73 123.855,147.73 Q402.3@124.785,148.66
CSP-5: Q502.1 Q502.2 Q502.3 R505.2 U501.12 | length 9.6
  Top Layer w0.254: R505.2@120.637,100.012 120.637,100.243 120.051,100.829 120.051,104.256 U501.12@120.934,105.139
  Top Layer w0.381: R505.2@121.241,99.639 123.776,99.639 Q502.3@124.706,100.569
CSP-6: Q602.1 Q602.2 Q602.3 R605.2 U601.12 | length 9.6
  Top Layer w0.254: R605.2@120.667,51.925 120.667,52.156 120.081,52.742 120.081,56.169 U601.12@120.964,57.052
  Top Layer w0.381: R605.2@121.271,51.552 123.806,51.552 Q602.3@124.736,52.482
DH-1: Q101.4 U101.2 | length 6.1
  Top Layer w0.254: U101.2@83.647,152.65 84.627,152.65 84.837,152.44 v1(84.94,152.44) ; v1(85.09,149.16) 85.248,149.002 86.132,149.002 Q101.4@86.29,148.845
  Bottom Layer w0.254: v1(84.94,152.44) 84.94,150.906 85.08,150.766 85.08,149.17 v1(85.09,149.16)
DH-2: Q201.4 U201.2 | length 6.8
  Top Layer w0.305: U201.2@83.487,104.33 84.871,104.33 85.121,104.08 v1(85.21,104.08) ; v1(85.77,100.51) 85.773,100.508 86.937,100.508 Q201.4@86.94,100.505
  Bottom Layer w0.305: v1(85.21,104.08) 85.21,103.991 85.77,103.431 v1(85.77,100.51)
DH-3: Q301.4 U301.2 | length 6.8
  Top Layer w0.305: U301.2@83.75,55.84 85.223,55.84 v1(85.473,55.59) ; v1(86.033,52.02) 86.035,52.018 Q301.4@87.2,52.018
  Bottom Layer w0.305: v1(85.473,55.59) 85.473,55.501 86.033,54.941 v1(86.033,52.02)
DH-4: Q401.4 U401.2 | length 13.5
  Top Layer w0.254: Q401.4@115.22,153.175 115.42,153.175 116.29,154.045 v1(116.29,154.1) ; U401.2@123.807,153.73 125.437,153.73 125.587,153.58 v1(125.69,153.58)
  Bottom Layer w0.254: v1(116.29,154.1) 116.29,154.07 117.335,153.025 125.032,153.025 125.587,153.58 v1(125.69,153.58)
DH-5: Q501.4 U501.2 | length 12.8
  Top Layer w0.254: Q501.4@115.564,105.307 116.137,105.88 116.137,105.987 v1(116.21,106.06) ; U501.2@123.728,105.639 v1@125.358,105.639
  Bottom Layer w0.254: v1(116.21,106.06) 116.21,105.957 117.267,104.9 124.919,104.9 125.508,105.489 v1(125.611,105.489)
DH-6: Q601.4 U601.2 | length 13.1
  Top Layer w0.254: Q601.4@115.547,57.22 115.547,57.598 v1(116.041,58.092) ; U601.2@123.758,57.552 v1@125.388,57.552
  Bottom Layer w0.254: v1(116.041,58.092) 117.333,56.8 124.936,56.8 125.538,57.402 v1(125.641,57.402)
DL-1: Q102.4 U101.16 | length 12
  Top Layer w0.254: Q102.4@74.102,147.726 74.102,148.993 74.251,149.142 80.296,149.142 80.401,149.247 v7(81.058,149.247) ; U101.16@83,151.503 83,150.649 83.11,150.539 v7(83.11,150.47)
  Bottom Layer w0.254: v7(81.058,149.247) 81.541,149.731 81.541,149.841 82.17,150.47 v7(83.11,150.47)
DL-2: Q202.4 U201.16 | length 12.7
  Top Layer w0.254: Q202.4@74.785,99.22 74.785,99.835 v1(75.95,101) ; U201.16@82.84,103.183 83.497,103.183 v1(84.17,102.51)
  Bottom Layer w0.254: v1(75.95,101) 77.46,102.51 v1(84.17,102.51)
DL-3: Q302.4 U301.16 | length 12.7
  Top Layer w0.254: Q302.4@75.048,50.73 75.048,51.345 v1(76.213,52.51) ; U301.16@83.103,54.693 83.76,54.693 v1(84.433,54.02)
  Bottom Layer w0.254: v1(76.213,52.51) 77.723,54.02 v1(84.433,54.02)
DL-4: Q402.4 U401.16 | length 3.9
  Top Layer w0.254: U401.16@123.16,152.583 123.16,152.304 123.515,151.949 Q402.4@123.515,148.86
DL-5: Q502.4 U501.16 | length 3.6
  Top Layer w0.254: U501.16@123.081,104.213 123.436,103.858 Q502.4@123.436,100.769
DL-6: Q602.4 U601.16 | length 3.6
  Top Layer w0.254: U601.16@123.111,56.126 123.466,55.771 Q602.4@123.466,52.682